# Altium PCB Baseboard-v2.0.PcbDoc (part 2 of 7)
Units mil, origin at the board's own origin, x right, y up, seen from the top; angles counter-clockwise.
Board outline 4488.19 x 3937 mil, 4 copper layers (Top Layer, Ground, Power + Signal, Bottom Layer), stack 61.81 mil thick; 219 components, 194 nets, 891 pads, 449 vias.
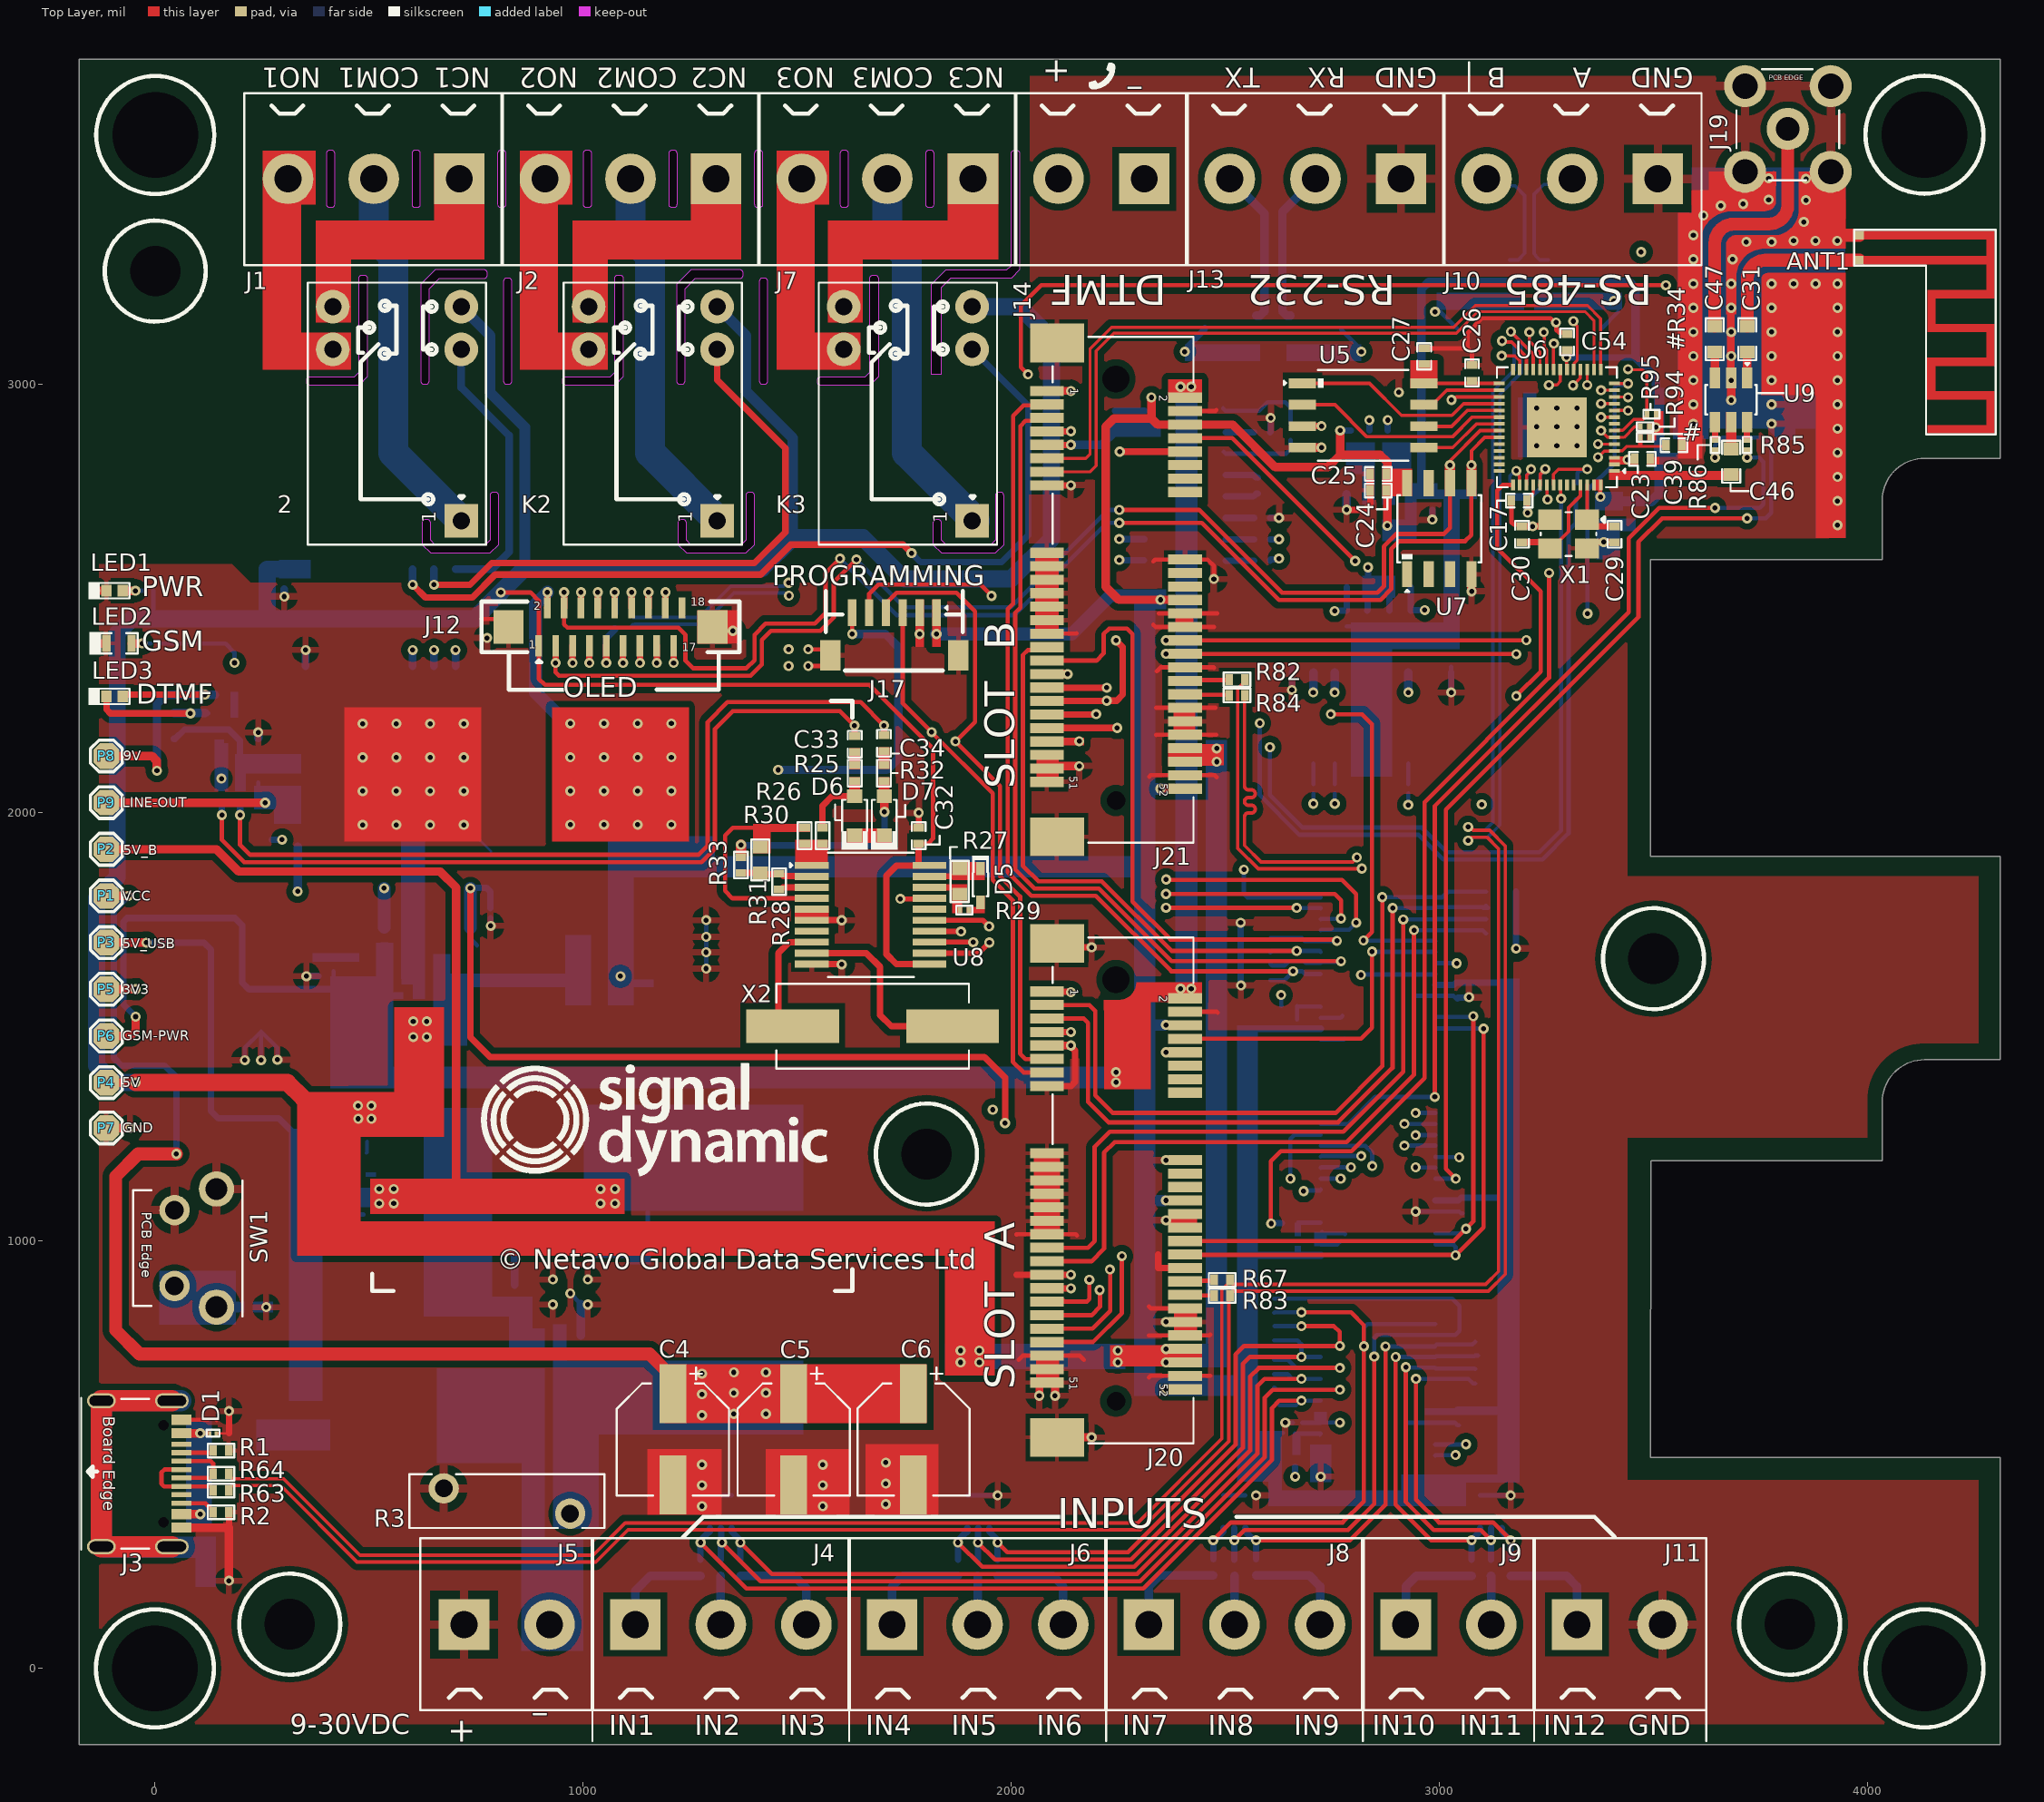
[diagram p0: Top Layer view]

## Part data (continued)
C14: library part TAJE337M016RNJ, "CAP TANT 330UF 20% 16V 2917", Case Code (Imperial)=2917, Case Code (Metric)=7343, ESR (Equivalent Series Resistance)=400mR, LCSC Part Number=C51599, Leakage Current=52.8uA, Manufacturer="Kyocera AVX", Max Operating Temperature=125°C, Min Operating Temperature=-55°C, Tolerance=20%, Voltage Rating=16V, Case/Package=2917, Category="Tantalum Capacitors", ComponentLink1Description=https://datasheet.ciiva.com/12882/taj-27497-12882412.pdf?src-supplier=Mouser, ComponentLink1URL=https://datasheet.ciiva.com/12882/taj-27497-12882412.pdf?src-supplier=Mouser, Dissipation Factor=30%, Features="General Purpose", Height=4.3mm, Item Type=Capacitor, Lead Free="Lead Free", Length=7.3mm, Manufacturer Part Number=TAJE337M016RNJ, Mounting Technology="Surface Mount", Packaging="Tape and Reel", Pricing 1="400=1.8678, 2000=1.7998, 4000=1.7657, 6000=1.7481, 10000=1.7306, 30000=1.7133, 50000=1.6961 (USD)", RoHS=Yes, RoHS Compliant=Yes, Series=TAJ, Stock 1=4000, Supplier 1="Arrow Electronics", Supplier Part Number 1=TAJE337M016RNJ, Termination=SMD/SMT, Voltage Rating (DC)=16V, Width=4.3mm